# Altium PCB SPSU.PcbDoc
Units mil, origin at the board's own origin, x right, y up, seen from the top; angles counter-clockwise.
Board outline 1757.74 x 2141.82 mil, 2 copper layers (Top, Bottom); 44 components, 39 nets, 162 pads, 320 vias.
Unrouted connection lines stored in the file: 156.
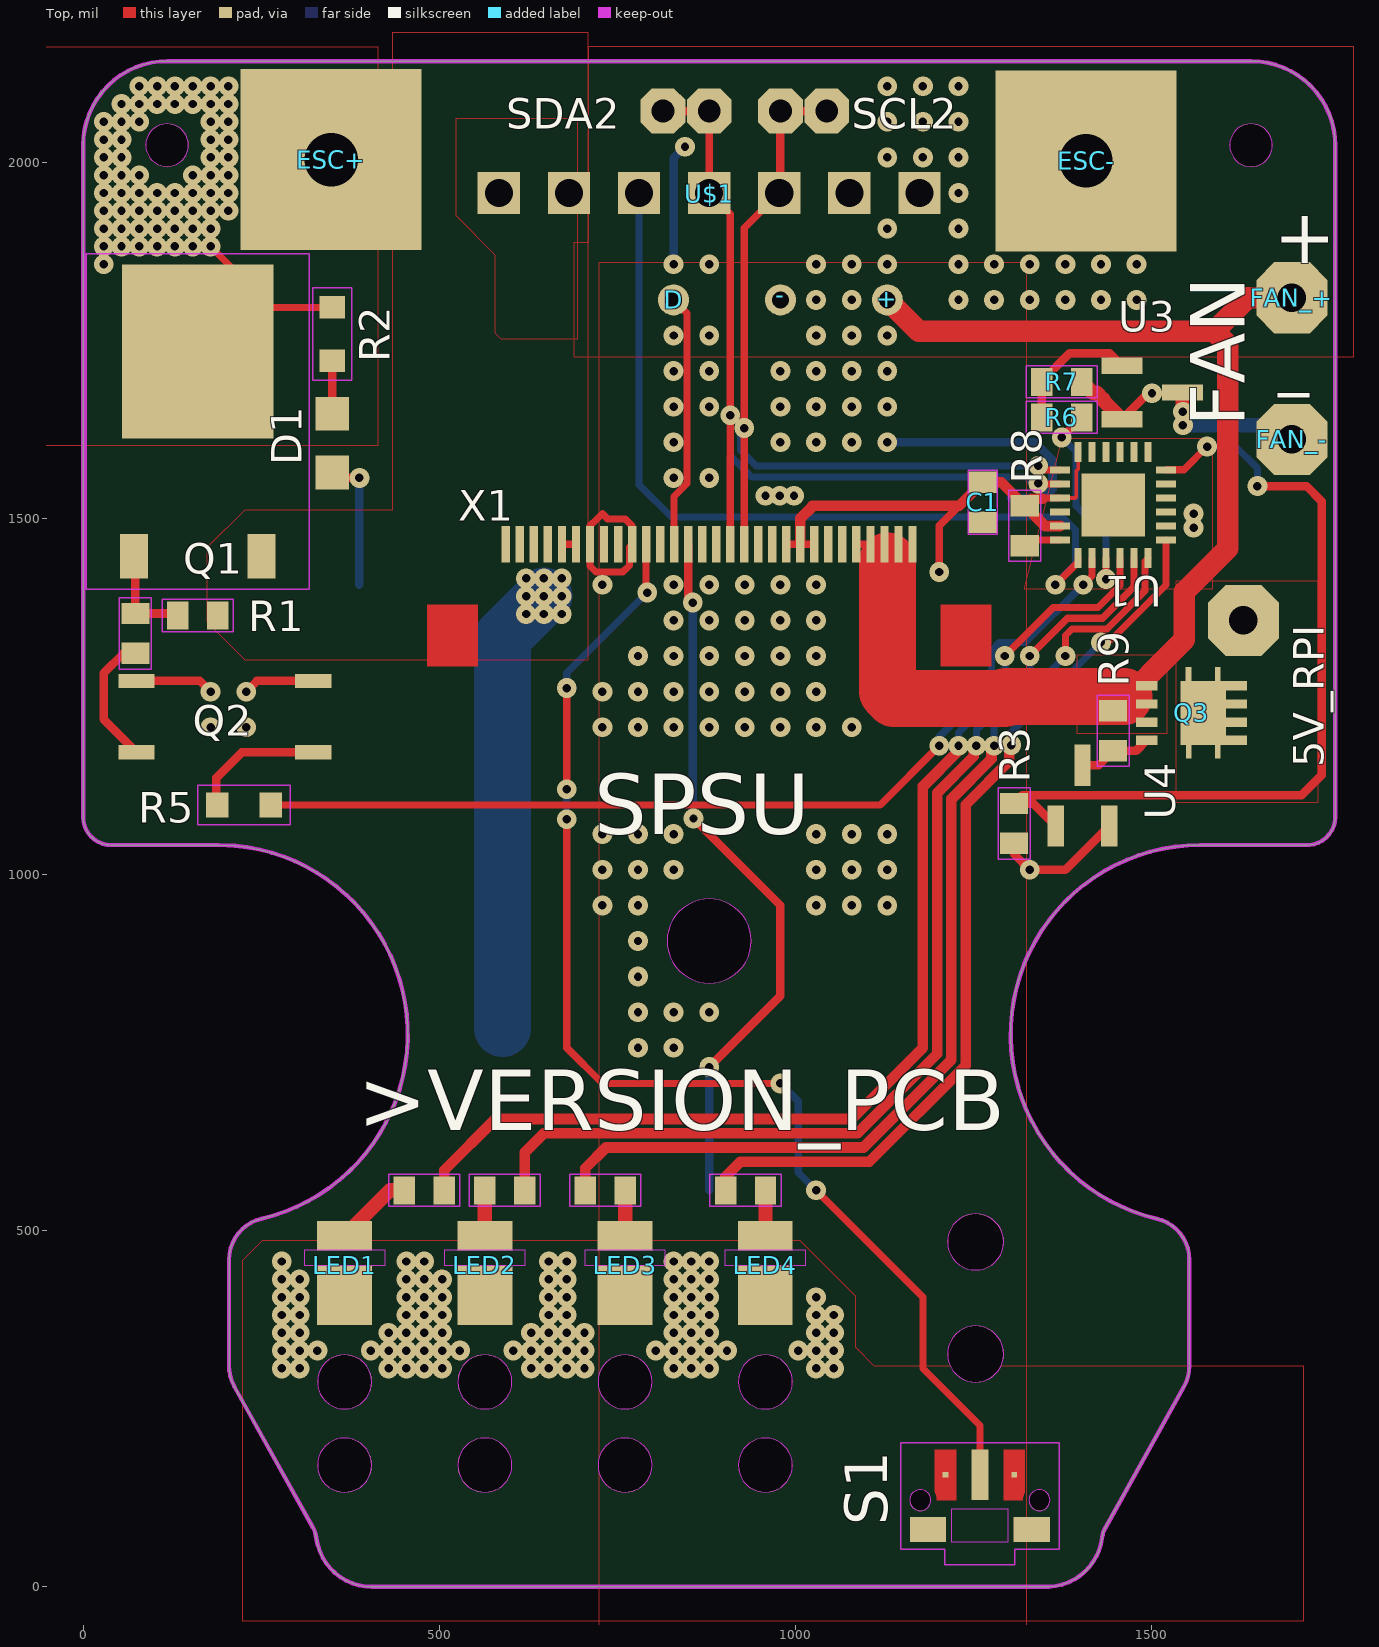
[diagram p0: Top view]
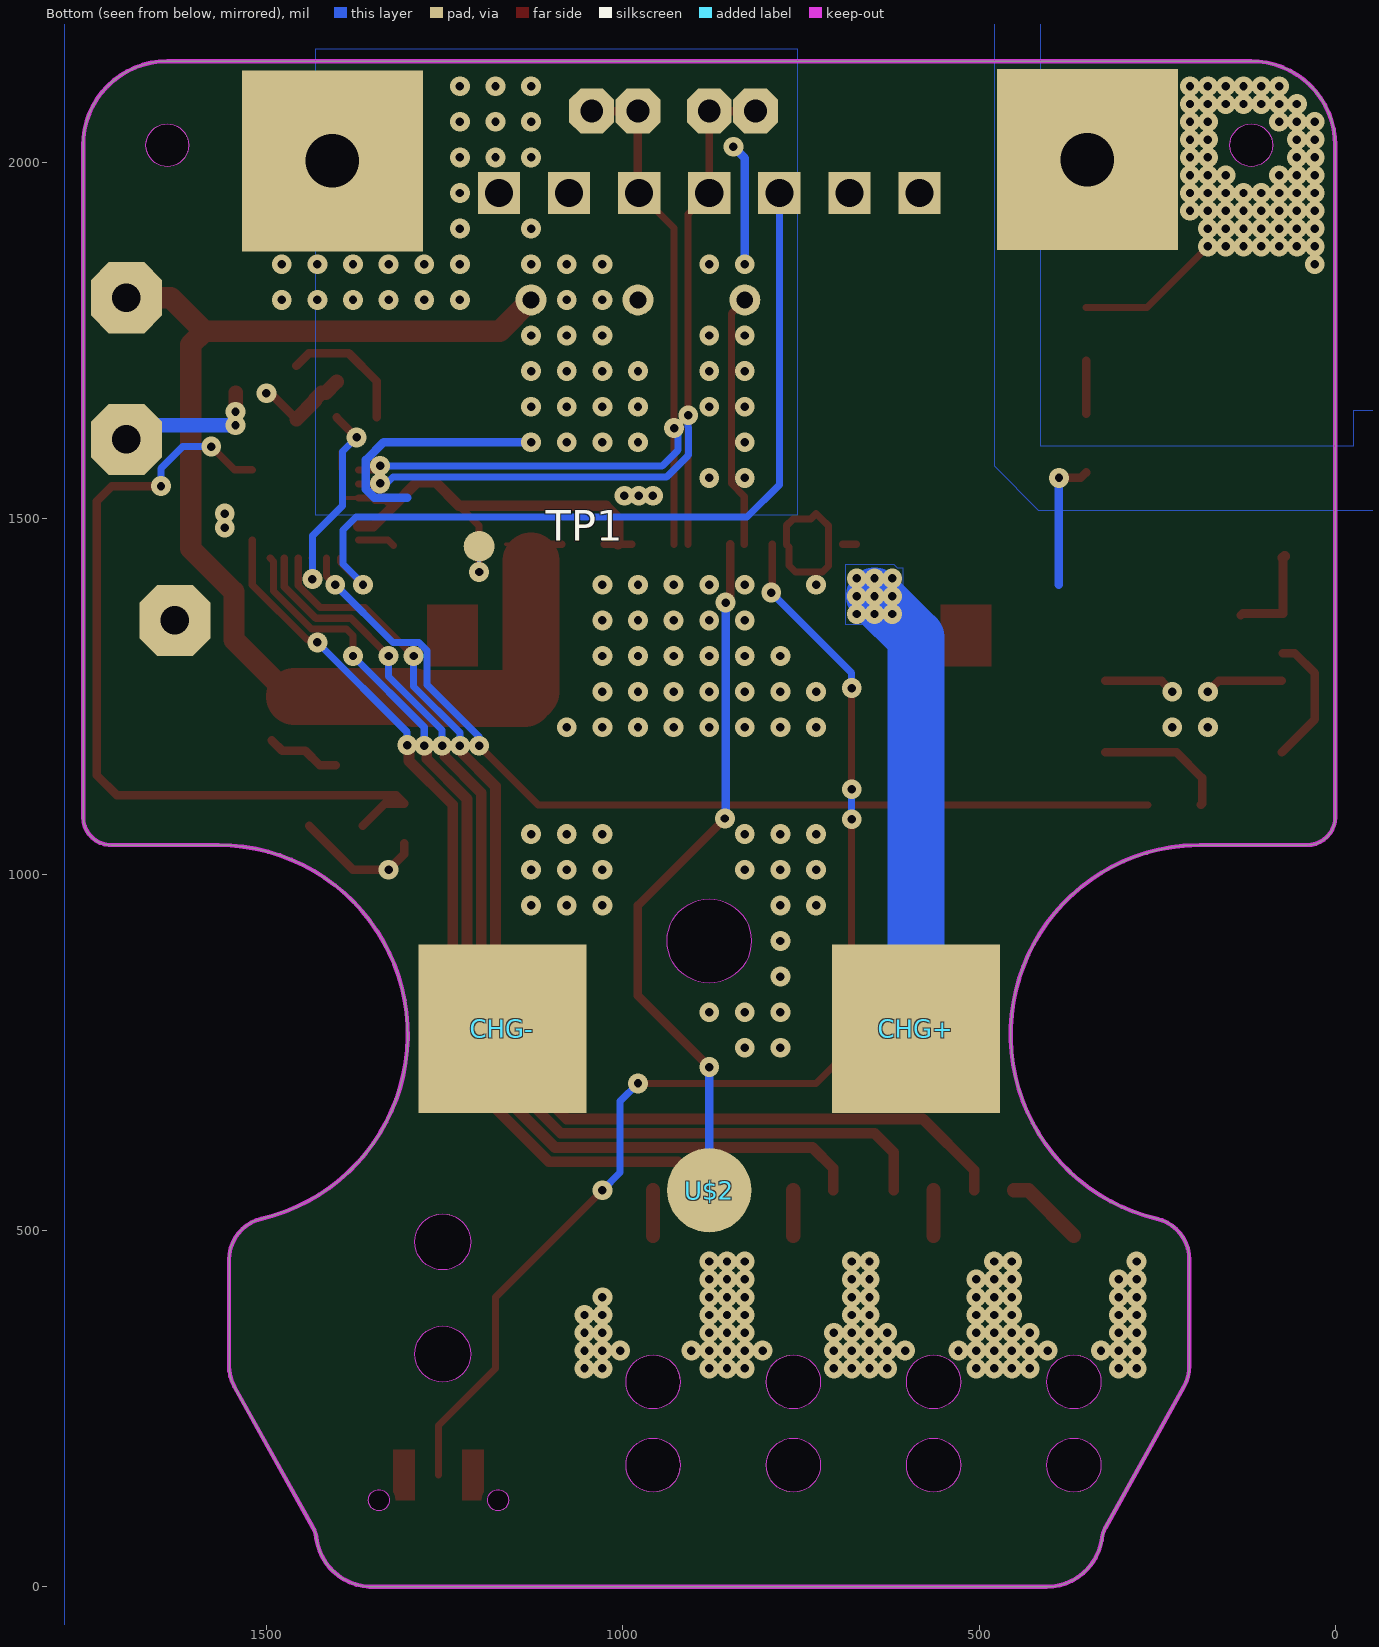
[diagram p1: Bottom view, seen from below]

## Layer stack, top to bottom
Top Solder: solder mask 0.4, Solder Resist, Dk 3.5
Top: signal copper 1.378
Dielectric 1: dielectric 12.6, FR-4, Dk 4.8
Bottom: signal copper 1.378
Bottom Solder: solder mask 0.4, Solder Resist, Dk 3.5

## Board outline
1431.24,73.62 1430.55,70.26 1430.36,68.92 cw(c1352.24,78.74) 1356.13,0.1 1352.23,0 405.51,0 cw(c405.51,78.74) 329.45,58.36 327.96,65.06 327.38,68.92 325.94,75.63 324.78,78.86 323.35,81.98 322.71,83.17 212.28,281.35 cw(c263.87,310.1) 204.81,310.1 204.81,459.32 cw(c263.86,459.32) 250.41,516.82 ccw(c189.89,775.58) 213.05,1040.32 189.89,1041.34 39.37,1041.34 cw(c39.37,1080.71) 0,1080.71 0,2023.71 cw(c118.11,2023.72) 107.81,2141.38 118.11,2141.82 1639.63,2141.82 cw(c1639.64,2023.71) 1757.3,2034.01 1757.74,2023.71 1757.74,1080.71 cw(c1718.37,1080.71) 1721.81,1041.49 1718.37,1041.34 1567.85,1041.34 ccw(c1567.85,775.59) 1507.33,516.82 cw(c1493.88,459.32) 1552.93,459.32 1552.93,310.1 cw(c1493.87,310.1) 1545.46,281.35 1435.03,83.17 ccw(c1469.4,63.98) 1432.22,76.91
cut-out: 878.87,847.63 ccw(c878.87,906.69) 937.92,906.69 ccw(c878.87,906.69) 878.87,965.75 ccw(c878.87,906.69) 819.82,906.69 ccw(c878.87,906.69)
cut-out: 1252.89,444.97 ccw(c1252.89,484.34) 1292.26,484.34 ccw(c1252.89,484.34) 1252.89,523.71 ccw(c1252.89,484.34) 1213.52,484.34 ccw(c1252.89,484.34)
cut-out: 1252.89,287.49 ccw(c1252.89,326.86) 1292.26,326.86 ccw(c1252.89,326.86) 1252.89,366.23 ccw(c1252.89,326.86) 1213.52,326.86 ccw(c1252.89,326.86)
cut-out: 760.76,249.8 ccw(c760.76,287.79) 798.75,287.79 ccw(c760.76,287.79) 760.76,325.78 ccw(c760.76,287.79) 722.77,287.79 ccw(c760.76,287.79)
cut-out: 563.91,132.87 ccw(c563.91,170.86) 601.9,170.86 ccw(c563.91,170.86) 563.91,208.85 ccw(c563.91,170.86) 525.92,170.86 ccw(c563.91,170.86)
cut-out: 760.76,132.87 ccw(c760.76,170.86) 798.75,170.86 ccw(c760.76,170.86) 760.76,208.85 ccw(c760.76,170.86) 722.77,170.86 ccw(c760.76,170.86)
cut-out: 957.61,249.8 ccw(c957.61,287.79) 995.6,287.79 ccw(c957.61,287.79) 957.61,325.78 ccw(c957.61,287.79) 919.62,287.79 ccw(c957.61,287.79)
cut-out: 957.61,132.87 ccw(c957.61,170.86) 995.6,170.86 ccw(c957.61,170.86) 957.61,208.85 ccw(c957.61,170.86) 919.62,170.86 ccw(c957.61,170.86)
cut-out: 367.06,249.8 ccw(c367.06,287.79) 405.05,287.79 ccw(c367.06,287.79) 367.06,325.78 ccw(c367.06,287.79) 329.07,287.79 ccw(c367.06,287.79)
cut-out: 563.91,249.8 ccw(c563.91,287.79) 601.9,287.79 ccw(c563.91,287.79) 563.91,325.78 ccw(c563.91,287.79) 525.92,287.79 ccw(c563.91,287.79)
cut-out: 367.06,132.87 ccw(c367.06,170.86) 405.05,170.86 ccw(c367.06,170.86) 367.06,208.85 ccw(c367.06,170.86) 329.07,170.86 ccw(c367.06,170.86)
cut-out: 1639.52,1993.75 ccw(c1639.52,2023.75) 1669.52,2023.75 ccw(c1639.52,2023.75) 1639.52,2053.75 ccw(c1639.52,2023.75) 1609.52,2023.75 ccw(c1639.52,2023.75)
cut-out: 117.84,1993.86 ccw(c117.84,2023.86) 147.84,2023.86 ccw(c117.84,2023.86) 117.84,2053.86 ccw(c117.84,2023.86) 87.84,2023.86 ccw(c117.84,2023.86)
cut-out: 1342.53,106.92 ccw(c1342.53,121.69) 1357.3,121.69 ccw(c1342.53,121.69) 1342.53,136.46 ccw(c1342.53,121.69) 1327.77,121.69 ccw(c1342.53,121.69)
cut-out: 1175.21,106.92 ccw(c1175.21,121.69) 1189.97,121.69 ccw(c1175.21,121.69) 1175.21,136.46 ccw(c1175.21,121.69) 1160.44,121.69 ccw(c1175.21,121.69)

## Design rules (kind name [scope] priority, off if disabled: settings)
BoardOutlineClearance mdCopperDimension [All] p1: gap=10 ignorepadtopadclearanceinfootprint=FALSE except(0: Arc-SplitContinuation Track-SplitContinuation SMDPad-SplitContinuation THPad-SplitContinuation Via-SplitContinuation Fill-SplitContinuation Poly-SplitContinuation Region-SplitContinuation Text-SplitContinuation; 7.87: Poly-OutlineEdge Poly-CavityEdge Poly-CutoutEdge Poly-SplitBarrior)
Clearance Clearance_for_PolygonClass_Isolate_16 [InPolygonClass('Isolate_16') vs IsArc Or IsTrack Or IsPad Or IsVia Or IsFill Or IsRegion Or IsText] p1: gap=16 ignorepadtopadclearanceinfootprint=FALSE
Clearance "Clearance (Same Net)" [All] p2: gap=5 ignorepadtopadclearanceinfootprint=FALSE
Clearance [All] p3: gap=5 ignorepadtopadclearanceinfootprint=FALSE
HoleSize [All] p1: absolutevalues=TRUE maxlimit=100000 minlimit=11.81 maxpercent=80.000 minpercent=20.000
HoleToHoleClearance mdDrill [All] p1: gap=6 allowstackedmicrovias=TRUE
MinimumSolderMaskSliver [All] p1 off: minsoldermaskwidth=10
PasteMaskExpansion Expansion_SMDPaste_OFF [InPadClass('SMDPaste_OFF')] p1: expansion=0
PasteMaskExpansion mlMinCreamFrame [All] p2: expansion=0
PolygonConnect PolygonConnect_For_PolygonThermal_ON_Width100000_Gap100000 [InPolygonClass('PolygonThermal_ON_Width100000_Gap100000') vs Not IsVia] p1: connectstyle=Relief reliefconductorwidth=10 reliefentries=4 polygonreliefangle="90 Angle" airgapwidth=10
PolygonConnect PolygonConnect_For_PolygonThermal_OFF [InPolygonClass('PolygonThermal_OFF')] p2: connectstyle=Direct reliefconductorwidth=10 reliefentries=4 polygonreliefangle="90 Angle" airgapwidth=10
PolygonConnect ThermalVias [IsVia] p3: connectstyle=Direct reliefconductorwidth=10 reliefentries=4 polygonreliefangle="90 Angle" airgapwidth=10
PolygonConnect [All] p4: connectstyle=Relief reliefconductorwidth=10 reliefentries=4 polygonreliefangle="90 Angle" airgapwidth=10
RoutingVias [All] p1: holewidth=11.81 width=17.81 viastyle="Through Hole" minholewidth=11.81 minwidth=17.81 maxholewidth=100 maxwidth=100
SolderMaskExpansion Expansion_SMDSolder_OFF [InPadClass('SMDSolder_OFF')] p1: expansion=0 istentingtop=FALSE
SolderMaskExpansion mlMinStopFrame [All] p2: expansion=4 istentingtop=FALSE
Width [All] p1: maxlimit=10 minlimit=5 preferedwidth=5
26 further rules are at their usual default settings.

## Classes and differential pairs
polygon class PolygonThermal_ON_Width100000_Gap100000: Polygon_3_Net_+12V Polygon_4_Net_0V
polygon class PolygonThermal_OFF: Polygon_1_Net_0V Polygon_1_Net_+5V Polygon_1_Net_+5V_RPI Polygon_1_Net_+12V Polygon_1_Net_ESC_+ Polygon_2_Net_0V Polygon_2_Net_+12V Polygon_2_Net_ESC_+ Polygon_3_Net_0V Polygon_5_Net_0V Polygon_6_Net_0V
polygon class Isolate_16: Polygon_1_Net_+12V Polygon_2_Net_0V Polygon_2_Net_+12V
pad class SMDSolder_OFF: S1-1 S1-3 X1-1 X1-2 X1-3 X1-4 X1-5 X1-6 X1-7 X1-8 X1-9 X1-10 X1-11 X1-12 X1-13 X1-14 X1-15 X1-16 X1-17 X1-18 X1-19 X1-20 X1-21 X1-22 X1-23 X1-24 X1-25 X1-26 X1-27 X1-28 X1-29 X1-30
pad class SMDPaste_OFF: S1-1 S1-3 TP1-TP X1-1 X1-2 X1-3 X1-4 X1-5 X1-6 X1-7 X1-8 X1-9 X1-10 X1-11 X1-12 X1-13 X1-14 X1-15 X1-16 X1-17 X1-18 X1-19 X1-20 X1-21 X1-22 X1-23 X1-24 X1-25 X1-26 X1-27 X1-28 X1-29 X1-30

## Components (designator, comment, footprint, x,y, rotation, side; value= is the part's Value field where it differs from the comment)
5V_RPI "WIREPAD2,54/1,0" 2,54/1,0 1628.87,1356.69 r90 top
+ "" TH-0.75/0.6 1128.87,1806.69 r0 top
- "" TH-0.75/0.6 978.87,1806.69 r0 top
C1 "100nF" C0603 1262.87,1522.54 r90 top
CHG+ "" SMT-PAD_SQ6MM 588.59,783.56 r180 bottom
CHG- "" SMT-PAD_SQ6MM 1169.15,783.56 r180 bottom
D "" TH-0.75/0.6 828.87,1806.69 r0 top
D1 "" CHIPLED_0805 349.87,1605.69 r180 top
ESC+ "" ESC 348.12,2003.44 r180 top
ESC- "" ESC 1407.87,2001.69 r0 top
FAN_+ "WIREPAD2,54/1,0" 2,54/1,0 1696.87,1809.69 r0 top
FAN_- "WIREPAD2,54/1,0" 2,54/1,0 1696.87,1610.69 r0 top
LED1 "JE2835AWTLED_JE2835_CRW-L" LED_JE2835_CRW-L 367.06,440.94 r90 top
LED2 "JE2835AWTLED_JE2835_CRW-L" LED_JE2835_CRW-L 563.91,440.94 r90 top
LED3 "JE2835AWTLED_JE2835_CRW-L" LED_JE2835_CRW-L 760.76,440.94 r90 top
LED4 "JE2835AWTLED_JE2835_CRW-L" LED_JE2835_CRW-L 957.61,440.94 r90 top
Q1 "FDD4141TO252" TO252 160.87,1635.69 r0 top
Q2 "EL357N" EL357N(C)(TA)-VG_EVE-L 198.87,1221.69 r180 top
Q3 "" POWERDI3333-8_3P3X3P3_DIO 1555.87,1226.69 r0 top
R1 "100k" R0603#1 160.87,1363.69 r0 top
R2 "150" R0603#2 349.87,1758.69 r270 top
R3 "100k" R0603#1 1306.87,1071.69 r90 top
R4 "4k7" R0603#1 73.37,1338.44 r270 top
R5 "200" R0603#2 225.87,1097.69 r180 top
R6 "4k7" R0603#1 1373.87,1641.69 r0 top
R7 "100k" R0603#1 1373.87,1691.69 r180 top
R8 "100k" R0603#1 1321.87,1489.69 r270 top
R9 "100k" R0603#1 1445.87,1201.69 r90 top
R10 "150R" R0603#1 478.87,556.69 r0 top
R11 "150R" R0603#1 591.87,556.69 r0 top
R12 "150R" R0603#1 732.87,556.69 r180 top
R13 "150R" R0603#1 929.87,556.69 r180 top
S1 "TL3340AF160QG" SW_TL3340AF160QG 1258.87,121.69 r0 top
SCL1 "" 1,6/0,8 978.87,2071.69 r0 top
SCL2 "" 1,6/0,8 1043.87,2071.69 r0 top
SDA1 "" 1,6/0,8 813.87,2071.69 r0 top
SDA2 "" 1,6/0,8 878.87,2071.69 r0 top
TP1 "TPTP11R" TP11R 1201.87,1460.69 r180 bottom
U1 "PCAL6416AHF,128HWQFN24_PCAL_NXP-L" HWQFN24_PCAL_NXP-L 1445.87,1518.69 r90 top
U3 "2N7002,215TO-236AB_NEX-M" TO-236AB_NEX-M 1500.87,1676.69 r270 top
U4 "" TO-236AB_NEX-M 1402.87,1110.69 r0 top
U$1 "" BATT_CON_THT 878.87,1956.69 r180 top
U$2 "" SMT-PAD_R3MM 878.87,556.69 r180 bottom
X1 "FH12-30S-0.5SH" FH12-30S-0.5SH 878.87,1335.69 r0 top

## Footprints (in the part's own frame and the unit in brackets; to place one, negate y for a bottom-side part, rotate by r counter-clockwise, add the part's x,y. Pads: shape width x height; smd on the part's side, far side on the other; paste and mask are expansions set on the pad)
1,6/0,8 [mil] "1,6/0,8"
  oct 63x63 / inner round 58.2 / far side oct 63x63 hole 32: 1(0,0)
2,54/1,0 [mil] "2,54/1,0"
  oct 100x100 / inner round 92.39 / far side oct 100x100 hole 40: 1(0,0)
BATT_CON_THT [mm] "BATT_CON_THT"
  rect 1.508x1.508 / inner round 1.393 / far side rect 1.508x1.508 hole 1: P$1(-7.498,0) P$2(-4.998,0) P$3(-2.498,0) P$4(0.002,0) P$5(2.502,0) P$6(5.002,0) P$7(7.502,0)
C0603 [mil] "C0603"
  rect 30x39.4 smd: 1(-28,0) 2(28,0)
  Top keep-out lines w2: -44.96,20.56 -44.96,-20.56 44.96,-20.56 44.96,20.56 -44.96,20.56
CHIPLED_0805 [mil] "CHIPLED_0805"
  rect 47.24x47.24 smd: A(0,-41.34) C(0,41.34)
EL357N(C)(TA)-VG_EVE-L [mil] "EL357N(C)(TA)-VG_EVE-L"
  rect 51x20 smd: 1(-124,50) 2(-124,-50) 3(124,-50) 4(124,50)
ESC [mil] "ESC"
  rect 254x254 / inner round 234.67 / far side rect 254x254 hole 75: P$1(0,0)
FH12-30S-0.5SH [mil] "FH12-30S-0.5SH"
  rect 11.81x51.18 smd paste+0 mask+0: 1(-285.43,127.95) 2(-265.75,127.95) 3(-246.06,127.95) 4(-226.38,127.95) 5(-206.69,127.95) 6(-187.01,127.95) 7(-167.32,127.95) 8(-147.64,127.95) 9(-127.95,127.95) 10(-108.27,127.95) 11(-88.58,127.95) 12(-68.9,127.95) 13(-49.21,127.95) 14(-29.53,127.95) 15(-9.84,127.95) 16(9.84,127.95) 17(29.53,127.95) 18(49.21,127.95) 19(68.9,127.95) 20(88.58,127.95) 21(108.27,127.95) 22(127.95,127.95) 23(147.64,127.95) 24(167.32,127.95) 25(187.01,127.95) 26(206.69,127.95) 27(226.38,127.95) 28(246.06,127.95) 29(265.75,127.95) 30(285.43,127.95)
  Top region: -324.8,43.31 -324.8,-43.31 -395.67,-43.31 -395.67,43.31
  Top region: 395.67,43.31 395.67,-43.31 324.8,-43.31 324.8,43.31
HWQFN24_PCAL_NXP-L [mil] "HWQFN24_PCAL_NXP-L"
  rect 27.87x10.03 smd: 1(-74.44,49.23) 2(-74.44,29.53) 3(-74.44,9.85) 4(-74.44,-9.85) 5(-74.44,-29.53) 6(-74.44,-49.23) 13(74.44,-49.23) 14(74.44,-29.53) 15(74.44,-9.85) 16(74.44,9.85) 17(74.44,29.53) 18(74.44,49.23)
  rect 10.03x27.87 smd: 7(-49.23,-74.44) 8(-29.53,-74.44) 9(-9.85,-74.44) 10(9.85,-74.44) 11(29.53,-74.44) 12(49.23,-74.44) 19(49.23,74.44) 20(29.53,74.44) 21(9.85,74.44) 22(-9.85,74.44) 23(-29.53,74.44) 24(-49.23,74.44)
  rect 89x89 smd: 25(0,0)
LED_JE2835_CRW-L [mil] "LED_JE2835_CRW-L"
  rect 84x77 smd: 1(-31,0)
  rect 42x77 smd: 2(52,0)
  Top keep-out region: 10,56 32,56 32,-56 10,-56
  Top keep-out region: 10,56 32,56 32,-56 10,-56
POWERDI3333-8_3P3X3P3_DIO [mil] "POWERDI3333-8_3P3X3P3_DIO"
  rect 30x13 smd: 1(-63,38.39) 2(-63,12.8) 3(-63,-12.8) 4(-63,-38.39) 5(63,-38.39) 6(63,-12.8) 7(63,12.8) 8(63,38.39)
  rect 64x90 smd: 9(16.35,0)
  rect 8x20 smd: 10(-4.1,54.9) 11(37,54.9) 12(-4,-54.1) 13(37,-54.1)
R0603#1 [mil] "R0603"
  rect 30x39.4 smd: 1(-28,0) 2(28,0)
  Top keep-out lines w2: -49.96,-22.56 -49.96,22.56 49.96,22.56 49.96,-22.56 -49.96,-22.56
R0603#2 [mil] "R0603"
  rect 31.5x35.43 smd: 1(-37.4,0) 2(37.4,0)
  Top keep-out lines w2: 64.96,-27.56 -64.96,-27.56 -64.96,27.56 64.96,27.56 64.96,-27.56
SMT-PAD_R3MM [mm] "SMT-PAD_R3MM"
  rrect100% 3x3 smd: P$1(0,0)
SMT-PAD_SQ6MM [mm] "SMT-PAD_SQ6MM"
  rect 6x6 smd: P$1(0,0)
SW_TL3340AF160QG [mil] "SW_TL3340AF160QG"
  rect 7.87x7.87 smd paste+0 mask+0: 1(-48.23,35.43) 3(48.23,35.43)
  rect 23.62x70.87 smd: 2(0,35.43)
  rect 51.18x35.43 smd: S1(-72.83,-41.34) S2(72.83,-41.34)
  Top region: 63.19,71.06 33.27,71.06 33.27,-0.19 60.24,-0.19 60.22,0.34 60.24,1.05 60.29,1.74 60.37,2.43 60.42,2.79 60.45,3.14 60.55,3.84 60.67,4.54 60.83,5.22 60.92,5.57 61.02,5.99 61.24,6.83 61.49,7.65 61.8,8.47 61.97,8.88 62.09,9.19 62.36,9.83 62.65,10.44 62.98,11.04 63.19,11.39 63.19,11.81
  Top region: -63.18,71.06 -33.26,71.06 -33.26,-0.19 -60.24,-0.19 -60.22,0.34 -60.24,1.05 -60.29,1.74 -60.37,2.43 -60.42,2.79 -60.45,3.14 -60.55,3.84 -60.67,4.54 -60.83,5.22 -60.92,5.57 -61.02,5.99 -61.24,6.83 -61.49,7.65 -61.8,8.47 -61.97,8.88 -62.09,9.19 -62.36,9.83 -62.65,10.44 -62.98,11.04 -63.18,11.39 -63.18,11.81
  Top keep-out region: -39.37,-59.06 -39.37,-11.81 39.37,-11.81 39.37,-59.06
  Top keep-out region: -39.37,-59.06 -39.37,-11.81 39.37,-11.81 39.37,-59.06
  Top keep-out lines w1.97: -111.22,-68.9 -111.22,80.71 111.22,80.71 111.22,-68.9 49.21,-68.9 49.21,-90.55 -49.21,-90.55 -49.21,-68.9 -111.22,-68.9
TH-0.75/0.6 [mil] "TH-0.75/0.6"
  round 43.62 hole 23.62: P$2(0,0)
TO252 [mm] "TO252"
  rect 1x1.6 smd: 1(-2.28,-4.8) 2(2.28,-4.8)
  rect 5.4x6.2 smd: 3(0,2.5)
  Top keep-out lines w0.051: -3.973,-5.983 -3.973,5.983 3.973,5.983 3.973,-5.983 -3.973,-5.983
TO-236AB_NEX-M [mil] "TO-236AB_NEX-M"
  rect 23x58 smd: 1(-37.5,-42.5) 2(37.5,-42.5) 3(0,42.5)
TP11R [mil] "TP11R"
  rrect100% 43.31x43.31 smd paste+0: TP(0,0)

## Part data
5V_RPI FAN_+ FAN_-: library part 2,54/1,0, PackageName=2,54/1,0
+ - D: library part TH-0.75/0.6, PackageName=TH-0.75/0.6
C1: library part C0603, PackageName=C0603
CHG+ CHG-: library part SMT-PAD_SQ6MM, PackageName=SMT-PAD_SQ6MM
D1: library part CHIPLED_0805, PackageName=CHIPLED_0805
ESC+ ESC-: library part ESC, PackageName=ESC
LED1 LED2 LED3 LED4: library part LED_JE2835_CRW-L, PackageName=LED_JE2835_CRW-L
Q1: library part TO252, PackageName=TO252
Q2: library part EL357N(C)(TA)-VG_EVE-L, PackageName=EL357N(C)(TA)-VG_EVE-L
Q3: library part POWERDI3333-8_3P3X3P3_DIO, PackageName=POWERDI3333-8_3P3X3P3_DIO
R1 R2 R3 R4 R5 R6 R7 R8 R9 R10 R11 R12 R13: library part R0603, PackageName=R0603
S1: library part SW_TL3340AF160QG, PackageName=SW_TL3340AF160QG
SCL1 SCL2 SDA1 SDA2: library part 1,6/0,8, PackageName=1,6/0,8
TP1: library part TP11R, PackageName=TP11R
U1: library part HWQFN24_PCAL_NXP-L, PackageName=HWQFN24_PCAL_NXP-L
U3 U4: library part TO-236AB_NEX-M, PackageName=TO-236AB_NEX-M
U$1: library part BATT_CON_THT, PackageName=BATT_CON_THT
U$2: library part SMT-PAD_R3MM, PackageName=SMT-PAD_R3MM
X1: PackageName=FH12-30S-0.5SH

## Free pads (board coordinates)
  round 75.98 hole 75.98 unplated: MH1(957.61,170.86) MH2(957.61,287.79) MH3(367.06,287.79) MH4(367.06,170.86) MH5(563.91,287.79) MH6(760.76,170.86) MH7(760.76,287.79) MH8(563.91,170.86)
  round 29.53 hole 29.53 unplated: MH1(1175.21,121.69) MH2(1342.53,121.69)
  round 78.74 hole 78.74 unplated: MH9(1252.89,484.34) MH10(1252.89,326.86)
  round 60 hole 60 unplated: MH11(117.84,2023.86) MH12(1639.52,2023.75)
  round 118.11 hole 118.11 unplated: MH13(878.87,906.69)

## Via types
v1: diameter 27.81/27.81 (per signal layer), hole 11.81, Top to Bottom, 320 vias

## Nets (pads, with @x,y where several pads share a name; then routed paths per layer and width w, separated by ;. In a path a pad name is that pad's centre, name@x,y a point inside that pad or via, vN(x,y) a via of type N, cw(c..) or ccw(c..) an arc to the next point about the centre after c; other vN are vias at no path point)
0V: -.P$2 C1.1 CHG-.P$1 D1.C ESC-.P$1 LED1.1 LED2.1 LED3.1 LED4.1 Q2.2 Q2.3 R3.1 R7.1 S1.1 S1.3 U1.9 U1.25 U3.2 U4.2 U$1.P$1 U$1.P$2 X1.7 X1.10 X1.12 X1.15 X1.16 X1.19 X1.20 X1.24 X1.25 | length 1489
  Top w10: 711.55,1433.01 719.87,1424.69 757.6,1424.69 766.82,1433.91 766.82,1459.86 X1.10 770.6,1489.6 760.96,1499.23 736.33,1499.23 728.87,1506.69 721.41,1499.23 721.18,1499.23 711.55,1489.6 X1.7 711.55,1433.01
  Top w12: Q2.3 163.87,1271.69 v1(178.87,1256.69) ; v1(228.87,1256.69) 243.87,1271.69 Q2.2 ; D1.C 357.53,1556.69 v1(387.87,1556.69) ; R3.1 1306.87,1028.69 v1(1328.87,1006.69) 1378.87,1006.69 U4.2 ; U3.2 1494.87,1675.69 v1(1500.46,1675.69)
  Top w20: R7.1 1417.17,1676.39 1423.08,1676.39 1431.87,1667.6 1431.87,1665.69 U3.2
  Bottom w12: 387.87,1406.69 v1(387.87,1556.69) ; v1(828.87,1856.69) 828.87,2005.69 v1(844.87,2021.69) ; v1(1128.87,1606.69) 1336.02,1606.69 1360.78,1581.94 1360.78,1540.76 1349.12,1529.1 1302.46,1529.1
  other v1: 278.87,306.69 303.87,306.69 428.87,306.69 453.87,306.69 478.87,306.69 503.87,306.69 628.87,306.69 653.87,306.69 678.87,306.69 703.87,306.69 828.87,306.69 853.87,306.69 878.87,306.69 1028.87,306.69 1053.87,306.69 278.87,331.69 303.87,331.69 328.87,331.69 403.87,331.69 428.87,331.69 453.87,331.69 478.87,331.69 503.87,331.69 528.87,331.69 603.87,331.69 628.87,331.69 653.87,331.69 678.87,331.69 703.87,331.69 803.87,331.69 828.87,331.69 853.87,331.69 878.87,331.69 903.87,331.69 1003.87,331.69 1028.87,331.69 1053.87,331.69 278.87,356.69 303.87,356.69 428.87,356.69 453.87,356.69 478.87,356.69 503.87,356.69 628.87,356.69 653.87,356.69 678.87,356.69 703.87,356.69 828.87,356.69 853.87,356.69 878.87,356.69 1028.87,356.69 1053.87,356.69 278.87,381.69 303.87,381.69 453.87,381.69 478.87,381.69 503.87,381.69 653.87,381.69 678.87,381.69 828.87,381.69 853.87,381.69 878.87,381.69 1028.87,381.69 1053.87,381.69 278.87,406.69 303.87,406.69 453.87,406.69 478.87,406.69 503.87,406.69 653.87,406.69 678.87,406.69 828.87,406.69 853.87,406.69 878.87,406.69 1028.87,406.69 278.87,431.69 303.87,431.69 453.87,431.69 478.87,431.69 503.87,431.69 653.87,431.69 678.87,431.69 828.87,431.69 853.87,431.69 878.87,431.69 278.87,456.69 453.87,456.69 478.87,456.69 653.87,456.69 678.87,456.69 828.87,456.69 853.87,456.69 878.87,456.69 778.87,756.69 828.87,756.69 778.87,806.69 828.87,806.69 878.87,806.69 778.87,856.69 778.87,906.69 728.87,956.69 778.87,956.69 1028.87,956.69 1078.87,956.69 1128.87,956.69 728.87,1006.69 778.87,1006.69 828.87,1006.69 1028.87,1006.69 1078.87,1006.69 1128.87,1006.69 728.87,1056.69 778.87,1056.69 828.87,1056.69 1028.87,1056.69 1078.87,1056.69 1128.87,1056.69 178.87,1206.69 228.87,1206.69 728.87,1206.69 778.87,1206.69 828.87,1206.69 878.87,1206.69 928.87,1206.69 978.87,1206.69 1028.87,1206.69 1078.87,1206.69 728.87,1256.69 778.87,1256.69 828.87,1256.69 878.87,1256.69 928.87,1256.69 978.87,1256.69 1028.87,1256.69 778.87,1306.69 828.87,1306.69 878.87,1306.69 928.87,1306.69 978.87,1306.69 1028.87,1306.69 828.87,1356.69 878.87,1356.69 928.87,1356.69 978.87,1356.69 1028.87,1356.69 728.87,1406.69 828.87,1406.69 878.87,1406.69 928.87,1406.69 978.87,1406.69 1028.87,1406.69 1558.87,1486.69 1558.87,1506.69 957.87,1531.69 977.87,1531.69 997.87,1531.69 828.87,1556.69 878.87,1556.69 828.87,1606.69 978.87,1606.69 1028.87,1606.69 1078.87,1606.69 828.87,1656.69 878.87,1656.69 978.87,1656.69 1028.87,1656.69 1078.87,1656.69 1128.87,1656.69 828.87,1706.69 878.87,1706.69 978.87,1706.69 1028.87,1706.69 1078.87,1706.69 1128.87,1706.69 828.87,1756.69 878.87,1756.69 1028.87,1756.69 1078.87,1756.69 1128.87,1756.69 1028.87,1806.69 1078.87,1806.69 1228.87,1806.69 1278.87,1806.69 1328.87,1806.69 1378.87,1806.69 1428.87,1806.69 1478.87,1806.69 878.87,1856.69 1028.87,1856.69 1078.87,1856.69 1128.87,1856.69 1228.87,1856.69 1278.87,1856.69 1328.87,1856.69 1378.87,1856.69 1428.87,1856.69 1478.87,1856.69 1128.87,1906.69 1228.87,1906.69 1228.87,1956.69 1128.87,2006.69 1178.87,2006.69 1228.87,2006.69 1128.87,2056.69 1178.87,2056.69 1228.87,2056.69 1128.87,2106.69 1178.87,2106.69 1228.87,2106.69
+5V: +.P$2 FAN_+.1 Q3.1 Q3.2 Q3.3 R9.2 X1.26 X1.27 X1.28 X1.29 X1.30 | length 1837.4
  Top w5: X1.27 X1.28 ; X1.29 X1.30
  Top w10: X1.26 X1.27 ; X1.28@1128.87,1440.02 1128.87,1459.71 X1.28 X1.29
  Top w30: +.P$2 1172.87,1762.69 1587.87,1762.69 ; R9.2 1545.87,1329.69 1545.87,1396.69 1606.87,1457.69 1606.87,1743.69 1587.87,1762.69 ; FAN_+.1 1634.87,1809.69 1587.87,1762.69
  Top w80: X1.28@1128.87,1440.02 1128.87,1256.69 1138.18,1247.38 1293.18,1247.38 1295.49,1249.69 1460.87,1249.69
+5V_RPI: 5V_RPI.1 Q3.5 Q3.6 Q3.7 Q3.8 Q3.9 Q3.10 Q3.11 Q3.12 Q3.13
+12V: CHG+.P$1 Q1.2 R1.2 U$1.P$6 U$1.P$7 X1.1 X1.2 X1.3 X1.4 X1.5 X1.6 | length 651
  Top w10: X1.5 X1.6
  Bottom w80: CHG+.P$1 588.59,1332.41 v1(646.87,1390.69)
  other v1: 621.87,1365.69 646.87,1365.69 671.87,1365.69 621.87,1390.69 671.87,1390.69 621.87,1415.69 646.87,1415.69 671.87,1415.69
DOCK-COMM: U$2.P$1 X1.14 | length 1002.6
  Top w12: X1.14 849.34,1388.22 v1(855.87,1381.69) ; v1(856.87,1078.69) 978.87,956.69 978.87,829.69 v1(878.87,729.69)
  Bottom w12: v1(855.87,1381.69) 855.87,1078.69 v1(856.87,1078.69) ; U$2.P$1 v1(878.87,729.69)
ESC_+: ESC+.P$1 Q1.3 R2.1 | length 206.5
  Top w10: v1(178.87,1881.69) 264.47,1796.09 R2.1
  other v1: 28.87,1856.69 28.87,1881.69 53.87,1881.69 78.87,1881.69 103.87,1881.69 128.87,1881.69 153.87,1881.69 28.87,1906.69 53.87,1906.69 78.87,1906.69 103.87,1906.69 128.87,1906.69 153.87,1906.69 178.87,1906.69 28.87,1931.69 53.87,1931.69 78.87,1931.69 103.87,1931.69 128.87,1931.69 153.87,1931.69 178.87,1931.69 203.87,1931.69 28.87,1956.69 53.87,1956.69 78.87,1956.69 103.87,1956.69 128.87,1956.69 153.87,1956.69 178.87,1956.69 203.87,1956.69 28.87,1981.69 53.87,1981.69 78.87,1981.69 153.87,1981.69 178.87,1981.69 203.87,1981.69 28.87,2006.69 53.87,2006.69 178.87,2006.69 203.87,2006.69 28.87,2031.69 53.87,2031.69 178.87,2031.69 203.87,2031.69 28.87,2056.69 53.87,2056.69 78.87,2056.69 178.87,2056.69 203.87,2056.69 53.87,2081.69 78.87,2081.69 103.87,2081.69 128.87,2081.69 153.87,2081.69 178.87,2081.69 203.87,2081.69 78.87,2106.69 103.87,2106.69 128.87,2106.69 153.87,2106.69 178.87,2106.69 203.87,2106.69
IO_P0_0: U1.1 U$1.P$5 | length 1187.6
  Top w10: v1(1364.87,1406.69) 1396.65,1438.46 U1.1
  Bottom w10: U$1.P$5 780.36,1547.2 825.87,1501.69 1374.87,1501.69 1392.87,1483.69 1392.87,1435.69 1364.87,1407.69 v1(1364.87,1406.69)
IO_P0_1: R5.1 U1.2 | length 1346.9
  Top w10: R5.1 1118.87,1097.69 v1(1201.87,1180.69) ; v1(1403.87,1406.69) 1416.34,1419.16 U1.2
  Bottom w10: v1(1201.87,1180.69) 1201.87,1193.33 1274.96,1266.42 1274.96,1314.52 1286.04,1325.6 1322.78,1325.6 v1(1403.87,1406.69)
IO_P0_2: R6.2 U1.3 | length 294
  Top w10: v1(1435.87,1414.69) 1435.87,1444.1 U1.3
  Top w12: v1(1373.78,1613.69) 1373.87,1613.69 R6.2
  Bottom w10: v1(1373.78,1613.69) 1393.78,1593.69 1393.78,1517.69 1435.87,1475.6 v1(1435.87,1414.69)
IO_P0_3: U1.4 | length 1610.4
  Top w10: v1(1293.87,1306.69) 1361.87,1374.69 1424.87,1374.69 1455.72,1405.53 U1.4
  Top w15: 506.87,556.69 506.87,584.69 578.87,656.69 1078.87,656.69 1178.87,756.69 1178.87,1123.69 1228.87,1173.69 v1(1228.87,1180.69)
  Bottom w10: v1(1228.87,1180.69) 1228.87,1199.12 1293.87,1264.12 v1(1293.87,1306.69)
IO_P0_4: U1.5 | length 1528.7
  Top w10: v1(1328.87,1306.69) 1381.87,1359.69 1431.08,1359.69 1475.4,1404.01 U1.5
  Top w15: 619.87,556.69 619.87,609.69 646.87,636.69 1087.15,636.69 1198.87,748.41 1198.87,1114.41 1250.28,1165.81 1250.28,1177.1 v1(1253.87,1180.69)
  Bottom w10: v1(1253.87,1180.69) 1253.87,1202.9 1328.87,1277.9 v1(1328.87,1306.69)
IO_P0_5: U1.6 | length 1455.5
  Top w10: v1(1378.87,1306.69) 1378.87,1335.48 1388.08,1344.69 1437.3,1344.69 1490.42,1397.81 1490.42,1439.58 U1.6
  Top w15: 704.87,556.69 704.87,587.69 733.87,616.69 1095.44,616.69 1218.87,740.12 1218.87,1106.12 1275.28,1162.53 1275.28,1177.1 v1(1278.87,1180.69)
  Bottom w10: v1(1278.87,1180.69) 1278.87,1206.69 v1(1378.87,1306.69)
IO_P0_6: U1.7 | length 1281.2
  Top w10: v1(1428.87,1325.78) 1432.78,1329.69 1443.51,1329.69 1520.31,1406.49 U1.7
  Top w15: 901.87,556.69 901.87,575.69 922.87,596.69 1103.72,596.69 1238.87,731.84 1238.87,1097.84 1300.28,1159.24 1300.28,1179.1 v1(1302.87,1181.69)
  Bottom w10: v1(1302.87,1181.69) 1302.87,1199.78 v1(1428.87,1325.78)
IO_P0_7: U1.8
IO_P1_0: U1.10
IO_P1_1: U1.11
IO_P1_2: R3.2 U1.12 U4.1 | length 1183.5
  Top w10: U1.12 1520.63,1568.24 1545.42,1568.24 v1(1577.87,1600.69) ; v1@1647.87,1545.69 v1(1648.37,1545.19)
  Top w12: U4.1 1333.87,1099.69 R3.2 1318.37,1111.19 1710.37,1111.19 1738.87,1139.69 1738.87,1523.69 1717.37,1545.19 v1(1648.37,1545.19)
  Bottom w10: v1(1577.87,1600.69) 1617.87,1600.69 1648.37,1570.19 v1(1648.37,1545.19)
IO_P1_3: U1.13
IO_P1_4: U1.14
IO_P1_5: U1.15
IO_P1_6: U1.16
IO_P1_7: U1.17
N$1: Q1.1 R1.1 | length 141.8
  Top w12: Q1.1@73.37,1444.45 73.37,1366.44 130.12,1366.44 R1.1
  Top w15: Q1.1 Q1.1@73.37,1444.45
N$2: D1.A R2.2 | length 74.3
  Top w12: D1.A R2.2
N$3: Q2.4 | length 186
  Top w12: 73.37,1310.44 56.62,1310.44 28.87,1282.69 28.87,1217.69 Q2.4
N$4: Q2.1 R5.2 | length 189.6
  Top w12: R5.2 186.87,1099.29 186.87,1135.69 222.87,1171.69 Q2.1
N$5: R6.1 R7.2 U3.1 | length 186.9
  Top w12: R6.1 R7.2 1345.87,1692.69 1384.87,1731.69 1440.87,1731.69 U3.1
N$6: FAN_-.1 U3.3 | length 245.2
  Top w20: U3.3 v1@1543.37,1631.19 ; v1(1543.87,1630.69) v1@1543.37,1631.19 ; v1(1543.87,1649.69) 1543.87,1631.69 v1@1543.37,1631.19
  Bottom w20: v1(1543.87,1649.69) v1(1543.87,1630.69) 1676.87,1630.69 FAN_-.1
N$7: R8.2 U1.24 | length 52.8
  Top w10: R8.2 1329.65,1469.46 U1.24
N$8: Q3.4 R9.1 U4.3 | length 104.5
  Top w12: U4.3 1425.37,1153.19 R9.1 1478.26,1173.69 Q3.4
N$9: LED1.2 | length 110.2
  Top w20: LED1.2 430.81,556.69 450.87,556.69
N$10: LED2.2 | length 63.8
  Top w20: 563.87,556.69 563.87,492.98 LED2.2
N$11: LED3.2 | length 63.8
  Top w20: LED3.2 760.87,493.05 760.87,556.69
N$12: LED4.2 | length 63.9
  Top w20: LED4.2 957.87,493.2 957.87,556.69
N$13: D.P$2 X1.13 | length 358.4
  Top w10: D.P$2 847.78,1787.78 847.78,1548.86 829.66,1530.74 X1.13
SCL: SCL2.1 U1.19 U$1.P$3 X1.18 | length 1187.3
  Top w10: X1.18 v1(928.08,1626.69) 928.08,1907.56 U$1.P$3 ; v1(1340.87,1573.69) 1346.65,1567.91 U1.19
  Top w12: U$1.P$3 978.87,1958.35 978.87,2071.69 SCL2.1
  Bottom w10: v1(928.08,1626.69) 922.87,1621.48 922.87,1595.69 944.87,1573.69 v1(1340.87,1573.69)
SDA: SDA2.1 U1.20 U$1.P$4 X1.17 | length 1224.1
  Top w10: SDA2.1 878.87,1956.77 U$1.P$4 U$1.P$4@908.4,1927.08 ; X1.17 v1(908.4,1644.69) U$1.P$4@908.4,1927.08 ; U$1.P$4@908.4,1927.16 U$1.P$4@908.4,1927.08 ; v1(1340.87,1549.01) 1341.65,1548.22 U1.20
  Top w12: 813.87,2071.69 SDA2.1
  Bottom w10: 907.87,1588.69 909.37,1587.19 ; v1(908.4,1644.69) 908.4,1628.22 907.87,1627.69 907.87,1589.48 909.37,1587.98 909.37,1587.19 ; v1(1340.87,1549.01) 1331.87,1549.01 1322.87,1558.01 938.55,1558.01 909.37,1587.19
SW: S1.2 X1.11 | length 1740.7
  Top w10: v1(678.87,1077.69) 678.87,756.69 728.87,706.69 v1(978.87,706.69) ; v1(678.87,1119.69) v1(678.87,1261.69) ; X1.11 790.29,1397.27 v1(791.87,1395.69) ; v1(1028.87,556.69) 1178.87,406.69 1178.87,306.69 1258.87,226.69 S1.2
  Bottom w10: v1(678.87,1077.69) v1(678.87,1119.69) ; v1(678.87,1261.69) 678.87,1282.69 v1(791.87,1395.69) ; v1(978.87,706.69) 1003.87,681.69 1003.87,581.69 v1(1028.87,556.69)
VDD: C1.2 R8.1 TP1.TP U1.18 U1.21 U1.23 X1.21 X1.22 X1.23 | length 815.8
  Top w5: U1.21 1392.72,1528.53 1393.87,1529.69 1393.87,1566.3 1396.65,1569.07 U1.18
  Top w10: X1.21 X1.22 X1.23 ; v1(1201.87,1424.69) 1201.87,1489.54 C1.2 ; 1346.87,1527.6 1347.87,1528.6 1371.36,1528.6 U1.21
  Top w15: X1.22 1006.82,1499.64 1023.87,1516.69 1023.87,1517.69 1230.02,1517.69 C1.2 1289.02,1550.54 R8.1 ; 1346.87,1527.6 1331.78,1527.6 R8.1 ; U1.23 1350.4,1489.16 R8.1
  Bottom w6: v1(1201.87,1424.69) TP1.TP
pads on no net: R4.1 R4.2 R10.1 R10.2 R11.1 R11.2 R12.1 R12.2 R13.1 R13.2 S1.S1 S1.S2 SCL1.1 SDA1.1 U1.22 X1.8 X1.9

## Polygon pours and split planes (outlines as drawn)
+5V_RPI on Top "Polygon_1_Net_+5V_RPI" (solid, remove dead copper, pour order 2): 1533.87,1411.69 1533.87,1101.69 1733.87,1101.69 1733.87,1411.69
ESC_+ on Top "Polygon_1_Net_ESC_+" (solid, remove dead copper, pour order 3): -76.13,2161.69 413.87,2161.69 413.87,1601.69 -76.13,1601.69
+12V on Top "Polygon_2_Net_+12V" (solid, remove dead copper, pour order 4): 433.87,2181.69 433.87,1511.69 226.8,1511.69 173.87,1458.76 173.87,1354.62 226.8,1301.69 708.87,1301.69 708.87,2181.69
+12V on Top "Polygon_1_Net_+12V" (solid, remove dead copper, pour order 7): 523.87,2061.69 693.87,2061.69 693.87,1751.69 586.8,1751.69 578.87,1759.62 578.87,1869.62 523.87,1924.62
+5V on Top "Polygon_1_Net_+5V" (solid, remove dead copper, pour order 1): 1395.87,1308.69 1520.87,1308.69 1520.87,1197.69 1395.87,1197.69
0V on Top "Polygon_6_Net_0V" (solid, remove dead copper, pour order 9): 1374.19,1612.69 1528.87,1612.69 1584.87,1612.69 1584.87,1400.69 1321.19,1400.69
0V on Top "Polygon_5_Net_0V" (solid, remove dead copper, pour order 11): 723.87,1858.69 723.87,-166.31 1324.87,-166.31 1324.87,1858.69
0V on Top "Polygon_4_Net_0V" (solid, remove dead copper, pour order 6): 223.87,458.76 251.8,486.69 1005.94,486.69 1083.87,408.76 1083.87,336.76 1109.94,310.69 1712.87,310.69 1712.87,-48.31 223.87,-48.31
0V on Top "Polygon_1_Net_0V" (solid, remove dead copper, pour order 10): 708.87,2161.69 708.87,1886.69 688.87,1886.69 688.87,1726.69 1783.87,1726.69 1783.87,2161.69
ESC_+ on Bottom "Polygon_2_Net_ESC_+" (solid, remove dead copper, pour order 5): -126.13,2211.69 413.87,2211.69 413.87,1601.69 -26.13,1601.69 -26.13,1651.69 -126.13,1651.69
+12V on Bottom "Polygon_3_Net_+12V" (solid, remove dead copper, pour order 0): 606.87,1430.69 606.87,1350.69 686.87,1350.69 686.87,1435.69 619.8,1435.69 614.8,1430.69
0V on Bottom "Polygon_3_Net_0V" (solid, remove dead copper, pour order 8): 755.37,2159.19 755.37,1504.19 1431.37,1504.19 1431.37,2159.19
0V on Bottom "Polygon_2_Net_0V" (solid, remove dead copper, pour order 12): 478.87,2211.69 478.87,1573.76 416.8,1511.69 -76.13,1511.69 -76.13,-148.31 1783.87,-148.31 1783.87,2211.69

## Keep-outs
Keep-Out Layer:
  the board outline again, w6

## Silkscreen, mask and mechanical layers (free items; w line width, h text height)
Top Overlay:
  text "+" at 1671.26,1858.33 h76.5
  text "_" at 1677.53,1689.73 h63.75
  text "FAN" at 1630.35,1628.76 h76.5 r90
  text "SPSU" at 717.29,1056.69 h85
  text ">VERSION_PCB" at 385.56,640.69 h85
Dimension:
  the board outline again, w6
tPlace:
  drawing of 1847 lines, arcs and shapes, not listed
Document:
  circle w6: c1639.63,2023.71 r88.58
  circle w6: c118.11,2023.71 r88.58

## Text inside footprints (layer, text, board x,y; h text height)
LED1: Measures "0.138in/3.505mm" at 567.06,281.94 h21.25 r90; Measures "0.11in/2.794mm" at 379.06,729.94 h21.25 r90; Measures "0.079in/2.007mm" at 379.06,629.94 h21.25 r90; Measures "0.08in/2.032mm" at 257.06,263.94 h21.25 r90; Measures "0.138in/3.505mm" at 157.06,281.94 h21.25 r90; Measures "Alt 2 Padstyle: OX90Y60D30P" at 955.06,-142.06 h42.5 r90; Measures "Alt 1 Padstyle: OX60Y90D30P" at 881.06,-142.06 h42.5 r90; Measures "2nd Padstyle: RX42Y77D0T" at 805.06,-89.06 h42.5 r90; Measures "1st Padstyle: RX84Y77D0T" at 731.06,-81.06 h42.5 r90; tDocu "*" at 392.06,358.94 h42.5 r90; tPlace "*" at 392.06,329.94 h42.5 r90
LED2: Measures "0.138in/3.505mm" at 763.91,281.94 h21.25 r90; Measures "0.11in/2.794mm" at 575.91,729.94 h21.25 r90; Measures "0.079in/2.007mm" at 575.91,629.94 h21.25 r90; Measures "0.08in/2.032mm" at 453.91,263.94 h21.25 r90; Measures "0.138in/3.505mm" at 353.91,281.94 h21.25 r90; Measures "Alt 2 Padstyle: OX90Y60D30P" at 1151.91,-142.06 h42.5 r90; Measures "Alt 1 Padstyle: OX60Y90D30P" at 1077.91,-142.06 h42.5 r90; Measures "2nd Padstyle: RX42Y77D0T" at 1001.91,-89.06 h42.5 r90; Measures "1st Padstyle: RX84Y77D0T" at 927.91,-81.06 h42.5 r90; tDocu "*" at 588.91,358.94 h42.5 r90; tPlace "*" at 588.91,329.94 h42.5 r90
LED3: Measures "0.138in/3.505mm" at 960.76,281.94 h21.25 r90; Measures "0.11in/2.794mm" at 772.76,729.94 h21.25 r90; Measures "0.079in/2.007mm" at 772.76,629.94 h21.25 r90; Measures "0.08in/2.032mm" at 650.76,263.94 h21.25 r90; Measures "0.138in/3.505mm" at 550.76,281.94 h21.25 r90; Measures "Alt 2 Padstyle: OX90Y60D30P" at 1348.76,-142.06 h42.5 r90; Measures "Alt 1 Padstyle: OX60Y90D30P" at 1274.76,-142.06 h42.5 r90; Measures "2nd Padstyle: RX42Y77D0T" at 1198.76,-89.06 h42.5 r90; Measures "1st Padstyle: RX84Y77D0T" at 1124.76,-81.06 h42.5 r90; tDocu "*" at 785.76,358.94 h42.5 r90; tPlace "*" at 785.76,329.94 h42.5 r90
LED4: Measures "0.138in/3.505mm" at 1157.61,281.94 h21.25 r90; Measures "0.11in/2.794mm" at 969.61,729.94 h21.25 r90; Measures "0.079in/2.007mm" at 969.61,629.94 h21.25 r90; Measures "0.08in/2.032mm" at 847.61,263.94 h21.25 r90; Measures "0.138in/3.505mm" at 747.61,281.94 h21.25 r90; Measures "Alt 2 Padstyle: OX90Y60D30P" at 1545.61,-142.06 h42.5 r90; Measures "Alt 1 Padstyle: OX60Y90D30P" at 1471.61,-142.06 h42.5 r90; Measures "2nd Padstyle: RX42Y77D0T" at 1395.61,-89.06 h42.5 r90; Measures "1st Padstyle: RX84Y77D0T" at 1321.61,-81.06 h42.5 r90; tDocu "*" at 982.61,358.94 h42.5 r90; tPlace "*" at 982.61,329.94 h42.5 r90
Q2: Measures "0.035in/0.889mm" at 483.87,1425.69 h21.25 r180; Measures "0.1in/2.54mm" at 692.87,1233.69 h21.25 r180; Measures "0.169in/4.293mm" at -7.13,1233.69 h21.25 r180; Measures "0.287in/7.29mm" at 346.87,967.69 h21.25 r180; Measures "0.173in/4.394mm" at 357.87,1041.69 h21.25 r180; Measures "Alt 2 Padstyle: OX90Y60D30P" at 781.87,1805.69 h42.5 r180; Measures "Alt 1 Padstyle: OX60Y90D30P" at 781.87,1745.69 h42.5 r180; Measures "Pin One Padstyle: RX51Y20D0T" at 811.87,1565.69 h42.5 r180; Measures "Default Padstyle: RX51Y20D0T" at 797.87,1505.69 h42.5 r180; tDocu "*" at 292.87,1189.69 h42.5 r180
Q3: Measures "0.13in/3.302mm" at 1407.87,1016.69 h21.25; Measures "0.13in/3.302mm" at 1738.87,1214.69 h21.25; Measures "0.026in/0.65mm" at 1076.87,1239.69 h21.25; Measures "0.018in/0.457mm" at 1339.87,1384.69 h21.25; Measures "0.132in/3.353mm" at 1396.87,1534.69 h21.25; Measures "Alt 2 Padstyle: OX90Y60D30P" at 972.87,551.69 h42.5; Measures "Alt 1 Padstyle: OX60Y90D30P" at 972.87,611.69 h42.5; Measures "Heat Tab Padstyle: RX63Y89D0T" at 919.87,731.69 h42.5; Measures "Default Padstyle: RX30Y13D0T" at 956.87,791.69 h42.5
TP1: Bottom 3D Body ">TP_SIGNAL_NAME" at 1201.87,1385.69 h33.46
U1: Measures "0.161in/4.089mm" at 1699.87,1359.69 h21.25 r90; Measures "0.161in/4.089mm" at 1457.87,970.69 h21.25 r90; Measures "0.161in/4.089mm" at 1457.87,1797.69 h21.25 r90; Measures "0.161in/4.089mm" at 1166.87,1359.69 h21.25 r90; Measures "0.02in/0.508mm" at 1241.87,1441.69 h21.25 r90; Measures "0.02in/0.5mm" at 1418.87,1722.69 h21.25 r90; Measures "Alt 2 Padstyle: b229_152h76" at 2083.87,935.69 h42.5 r90; Measures "Alt 1 Padstyle: b152_229h76" at 2023.87,935.69 h42.5 r90; Measures "Heat Tab Padstyle: r226_226" at 1903.87,927.69 h42.5 r90; Measures "Default Padstyle: r25_71" at 1843.87,1010.69 h42.5 r90
U3: Measures "0.056in/1.422mm" at 1488.87,2174.69 h21.25 r270; Measures "0.119in/3.023mm" at 1770.87,1835.69 h21.25 r270; Measures "0.019in/0.483mm" at 1670.87,1835.69 h21.25 r270; Measures "0.075in/1.905mm" at 1306.87,1835.69 h21.25 r270; Measures "0.018in/0.457mm" at 1528.87,1522.69 h21.25 r270; Measures "0.099in/2.515mm" at 1488.87,1446.69 h21.25 r270; Measures "Alt 2 Padstyle: OX90Y60D30P" at 954.87,2259.69 h42.5 r270; Measures "Alt 1 Padstyle: OX60Y90D30P" at 1028.87,2259.69 h42.5 r270; Measures "Bottom Padstyle: RX23Y58D0T" at 1104.87,2259.69 h42.5 r270; Measures "Top Padstyle: RX23Y58D0T" at 1178.87,2206.69 h42.5 r270
U4: Measures "0.056in/1.422mm" at 904.87,1098.69 h21.25; Measures "0.119in/3.023mm" at 1243.87,1380.69 h21.25; Measures "0.019in/0.483mm" at 1243.87,1280.69 h21.25; Measures "0.075in/1.905mm" at 1243.87,916.69 h21.25; Measures "0.018in/0.457mm" at 1556.87,1138.69 h21.25; Measures "0.099in/2.515mm" at 1632.87,1098.69 h21.25; Measures "Alt 2 Padstyle: OX90Y60D30P" at 819.87,564.69 h42.5; Measures "Alt 1 Padstyle: OX60Y90D30P" at 819.87,638.69 h42.5; Measures "Bottom Padstyle: RX23Y58D0T" at 819.87,714.69 h42.5; Measures "Top Padstyle: RX23Y58D0T" at 872.87,788.69 h42.5